# Altium PCB My_esp.PcbDoc
Units mm, origin at the board's own origin, x right, y up, seen from the top; angles counter-clockwise.
Board outline 31.6 x 52.7 mm, 4 copper layers (Top Layer, GND, PWR, Bottom Layer), stack 1.781 mm thick; 43 components, 53 nets, 213 pads, 86 vias.
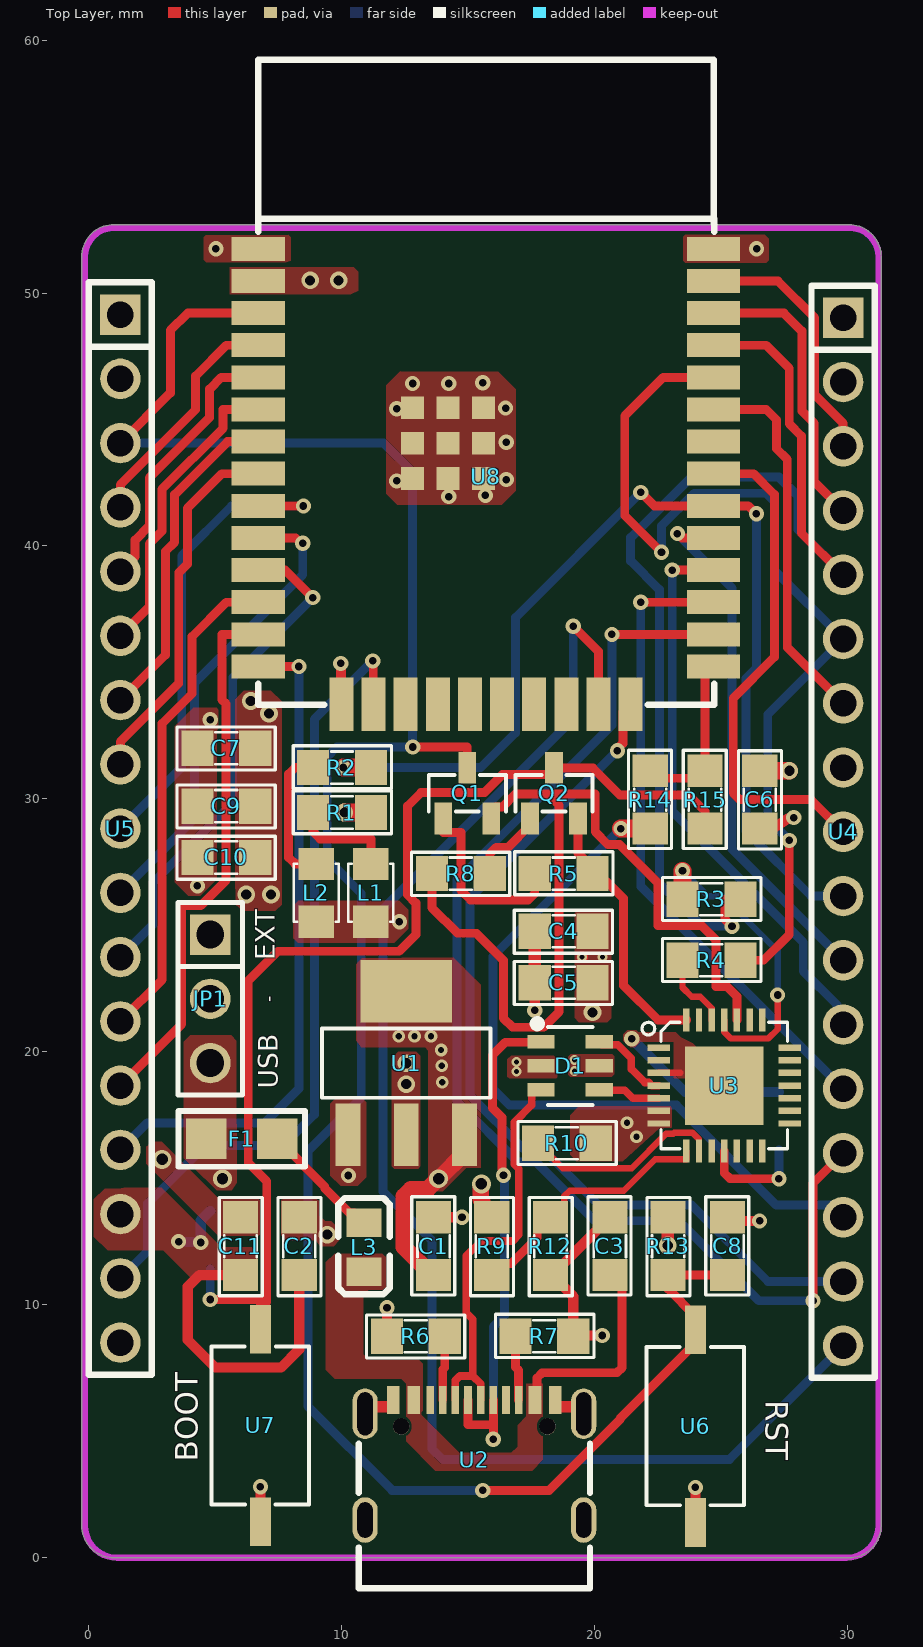
[diagram p0: Top Layer view]
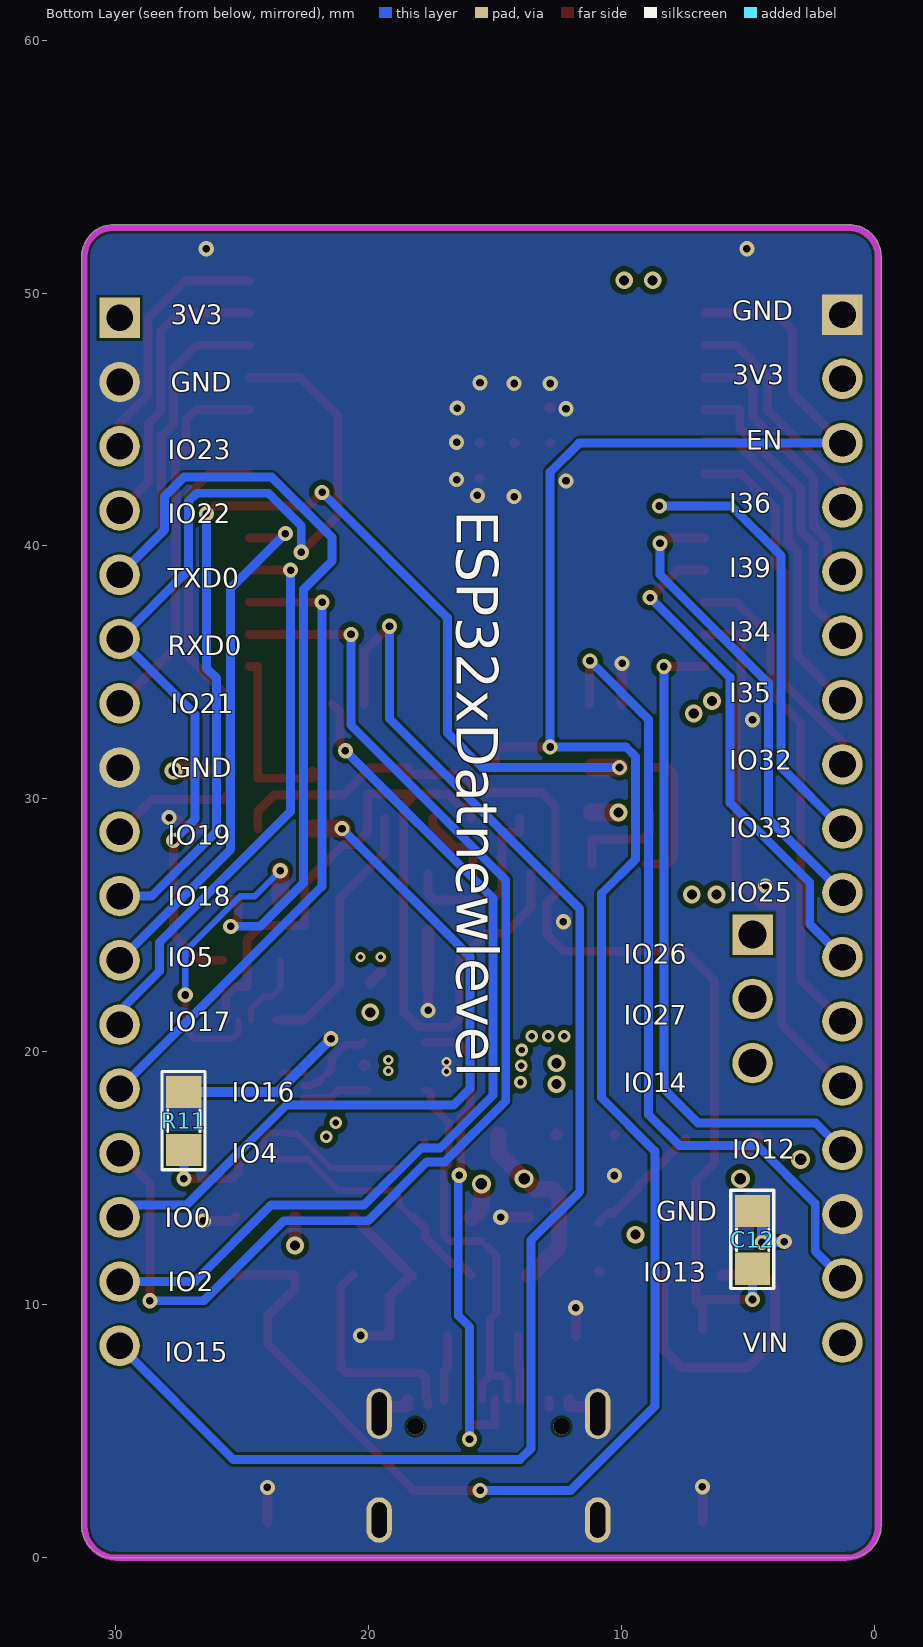
[diagram p1: Bottom Layer view, seen from below]
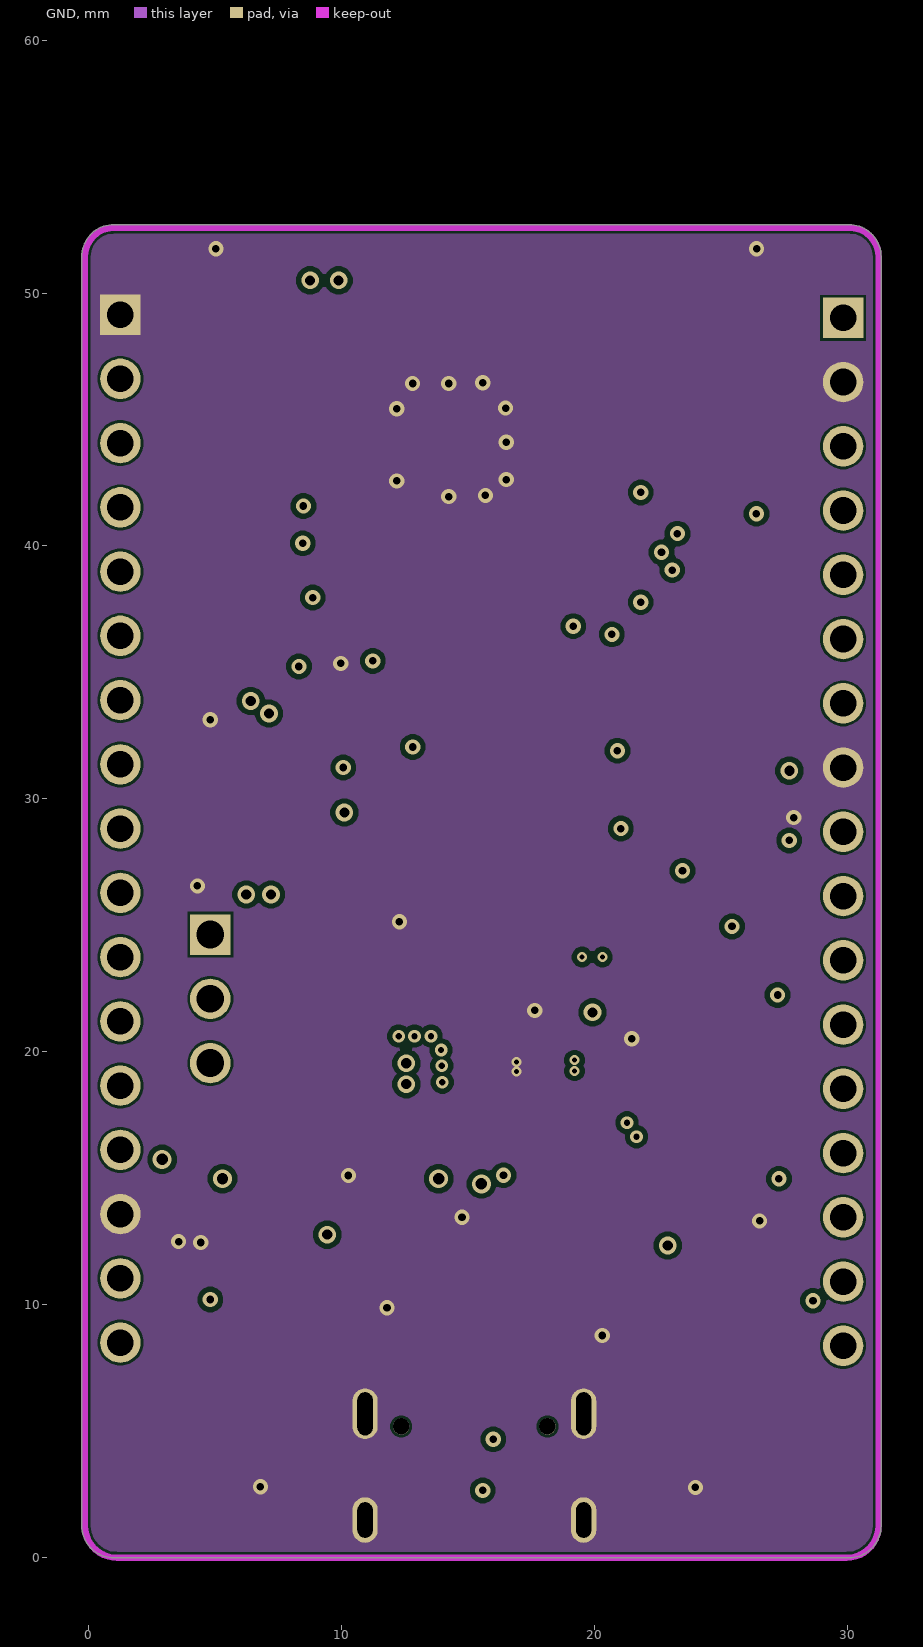
[diagram p2: GND]
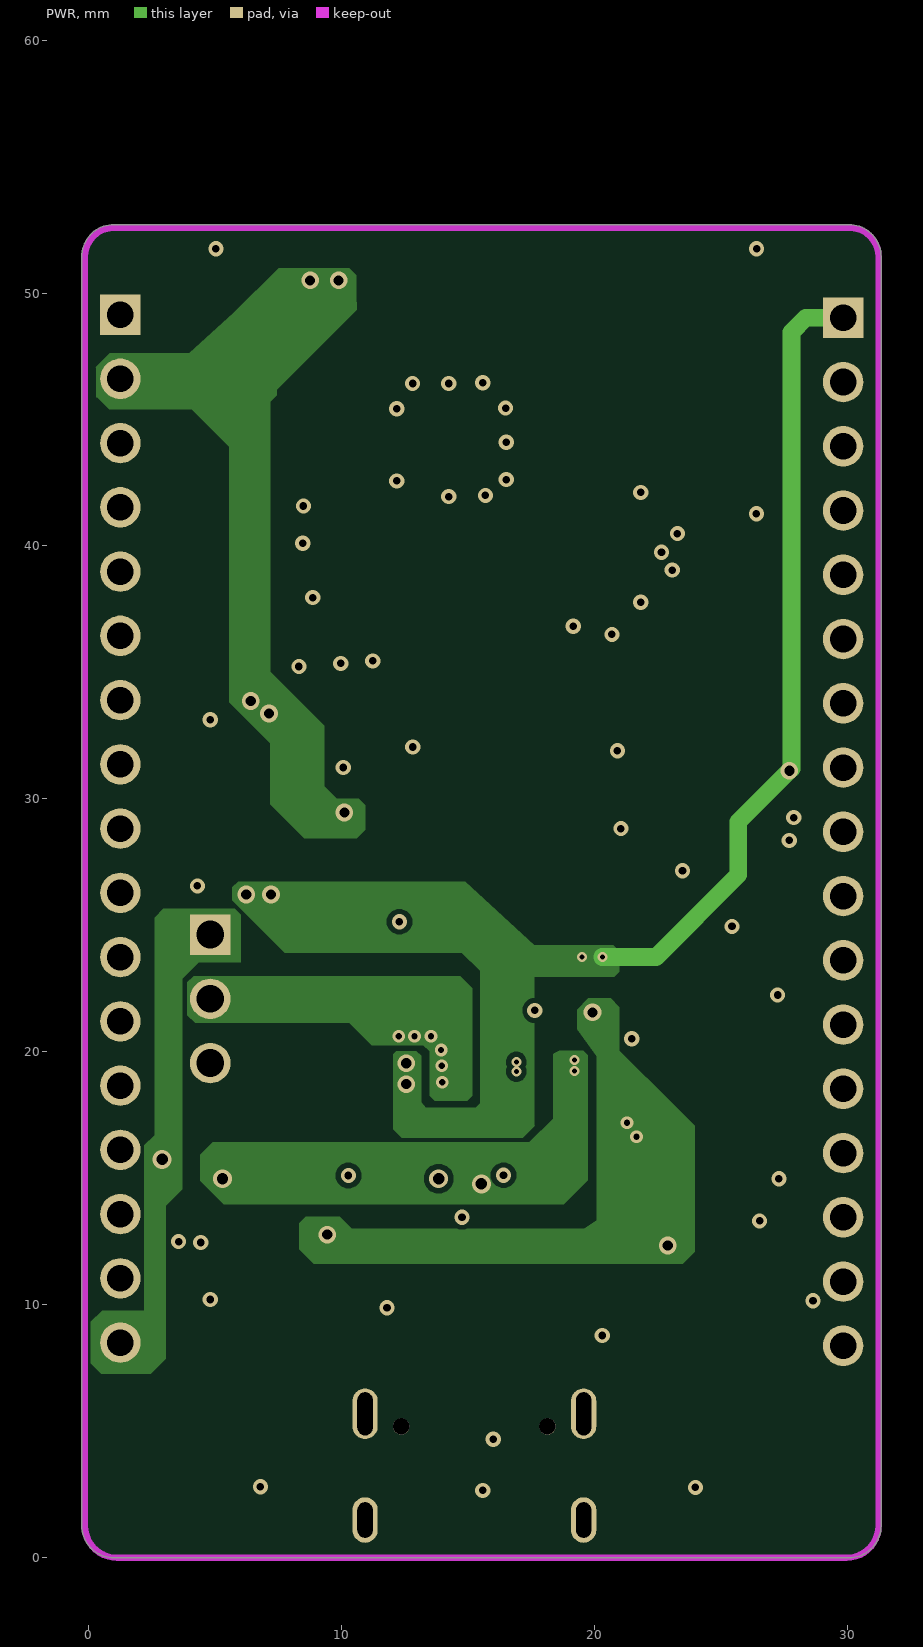
[diagram p3: PWR]
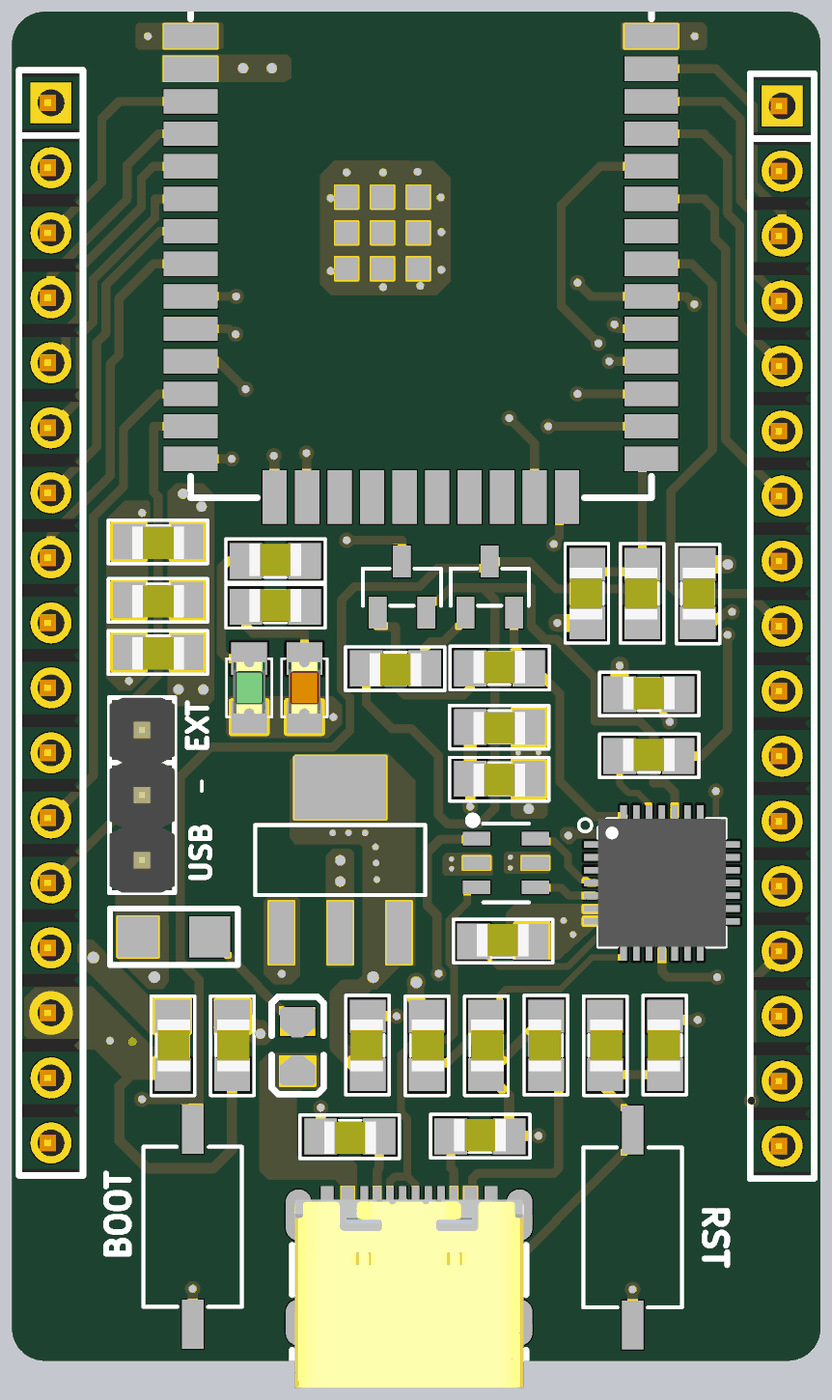
[diagram p4: 3D render of the assembled board from above, using the file's embedded part models]

## Layer stack, top to bottom
Top Solder: solder mask 0.0254, SM-001, Dk 4
Top Layer: signal copper 0.035
Dielectric 2: prepreg 0.0711, PP-006, Dk 4.1
GND: signal copper 0.035
Dielectric 1: core 1.4986, Core-043, Dk 4.3
PWR: signal copper 0.035
Dielectric 3: prepreg 0.0711, PP-006, Dk 4.1
Bottom Layer: signal copper 0.035
Bottom Solder: solder mask 0.0254, SM-001, Dk 4

## Board outline
-0.254,1.27 ccw(c1.016,1.27) 1.016,0 30.072,0 ccw(c30.072,1.27) 31.342,1.27 31.342,51.435 ccw(c30.072,51.435) 30.072,52.705 1.016,52.705 ccw(c1.016,51.435) -0.254,51.435

## Design rules (kind name [scope] priority, off if disabled: settings)
Clearance Clearance_Poly_Via [InPolygon vs IsVia] p1: gap=0.2 ignorepadtopadclearanceinfootprint=FALSE
Clearance [All] p2: gap=0.1 ignorepadtopadclearanceinfootprint=FALSE
DiffPairsRouting [InDifferentialPair('D')] p1: maxlimit=0.254 minlimit=0.254 mostfreqgap=0.254 toplayer_minwidth=0.381 toplayer_maxwidth=0.381 toplayer_prefwidth=0.381 midlayer1_minwidth=0.381 midlayer1_maxwidth=0.381 midlayer1_prefwidth=0.381 midlayer2_minwidth=0.381 midlayer2_maxwidth=0.381 midlayer2_prefwidth=0.381 bottomlayer_minwidth=0.381 bottomlayer_maxwidth=0.381 bottomlayer_prefwidth=0.381 maxuncoupledlength=12.7
HoleSize [All] p1: absolutevalues=TRUE maxlimit=2.54 minlimit=0.152 maxpercent=80.000 minpercent=20.000
MinimumSolderMaskSliver [All] p1: minsoldermaskwidth=0
PlaneClearance [All] p1: clearance=0.152
PolygonConnect [All] p1: connectstyle=Direct reliefconductorwidth=0.254 reliefentries=4 polygonreliefangle="90 Angle" airgapwidth=0.254
RoutingLayers RoutingLayers_52 [InNet('USB_D-')] p1: top layer_v5=TRUE mid layer 1_v5=FALSE mid layer 2_v5=FALSE bottom layer_v5=TRUE
RoutingLayers RoutingLayers_51 [InNet('USB_D+')] p2: top layer_v5=TRUE mid layer 1_v5=FALSE mid layer 2_v5=FALSE bottom layer_v5=TRUE
RoutingLayers RoutingLayers_50 [InNet('TXD0')] p3: top layer_v5=TRUE mid layer 1_v5=FALSE mid layer 2_v5=FALSE bottom layer_v5=TRUE
RoutingLayers RoutingLayers_49 [InNet('TXD')] p4: top layer_v5=TRUE mid layer 1_v5=FALSE mid layer 2_v5=FALSE bottom layer_v5=TRUE
RoutingLayers RoutingLayers_48 [InNet('RXD0')] p5: top layer_v5=TRUE mid layer 1_v5=FALSE mid layer 2_v5=FALSE bottom layer_v5=TRUE
RoutingLayers RoutingLayers_47 [InNet('RXD')] p6: top layer_v5=TRUE mid layer 1_v5=FALSE mid layer 2_v5=FALSE bottom layer_v5=TRUE
RoutingLayers RoutingLayers_46 [InNet('RTS')] p7: top layer_v5=TRUE mid layer 1_v5=FALSE mid layer 2_v5=FALSE bottom layer_v5=TRUE
RoutingLayers RoutingLayers_45 [InNet('NetR14_1')] p8: top layer_v5=TRUE mid layer 1_v5=FALSE mid layer 2_v5=FALSE bottom layer_v5=TRUE
RoutingLayers RoutingLayers_44 [InNet('NetR11_2')] p9: top layer_v5=TRUE mid layer 1_v5=FALSE mid layer 2_v5=FALSE bottom layer_v5=TRUE
RoutingLayers RoutingLayers_43 [InNet('NetR10_2')] p10: top layer_v5=TRUE mid layer 1_v5=FALSE mid layer 2_v5=FALSE bottom layer_v5=TRUE
RoutingLayers RoutingLayers_42 [InNet('NetR9_1')] p11: top layer_v5=TRUE mid layer 1_v5=FALSE mid layer 2_v5=FALSE bottom layer_v5=TRUE
RoutingLayers RoutingLayers_41 [InNet('NetQ2_1')] p12: top layer_v5=TRUE mid layer 1_v5=FALSE mid layer 2_v5=FALSE bottom layer_v5=TRUE
RoutingLayers RoutingLayers_40 [InNet('NetQ1_1')] p13: top layer_v5=TRUE mid layer 1_v5=FALSE mid layer 2_v5=FALSE bottom layer_v5=TRUE
RoutingLayers RoutingLayers_39 [InNet('NetL2_1')] p14: top layer_v5=TRUE mid layer 1_v5=FALSE mid layer 2_v5=FALSE bottom layer_v5=TRUE
RoutingLayers RoutingLayers_38 [InNet('NetL1_1')] p15: top layer_v5=TRUE mid layer 1_v5=FALSE mid layer 2_v5=FALSE bottom layer_v5=TRUE
RoutingLayers RoutingLayers_37 [InNet('NetF?_1')] p16: top layer_v5=TRUE mid layer 1_v5=FALSE mid layer 2_v5=FALSE bottom layer_v5=TRUE
RoutingLayers RoutingLayers_36 [InNet('NetC?_2')] p17: top layer_v5=TRUE mid layer 1_v5=FALSE mid layer 2_v5=FALSE bottom layer_v5=TRUE
RoutingLayers RoutingLayers_35 [InNet('IO_0_CON')] p18: top layer_v5=TRUE mid layer 1_v5=FALSE mid layer 2_v5=FALSE bottom layer_v5=TRUE
RoutingLayers RoutingLayers_34 [InNet('IO_0_BTN')] p19: top layer_v5=TRUE mid layer 1_v5=FALSE mid layer 2_v5=FALSE bottom layer_v5=TRUE
RoutingLayers RoutingLayers_33 [InNet('IO33')] p20: top layer_v5=TRUE mid layer 1_v5=FALSE mid layer 2_v5=FALSE bottom layer_v5=TRUE
RoutingLayers RoutingLayers_32 [InNet('IO32')] p21: top layer_v5=TRUE mid layer 1_v5=FALSE mid layer 2_v5=FALSE bottom layer_v5=TRUE
RoutingLayers RoutingLayers_31 [InNet('IO27')] p22: top layer_v5=TRUE mid layer 1_v5=FALSE mid layer 2_v5=FALSE bottom layer_v5=TRUE
RoutingLayers RoutingLayers_30 [InNet('IO26')] p23: top layer_v5=TRUE mid layer 1_v5=FALSE mid layer 2_v5=FALSE bottom layer_v5=TRUE
RoutingLayers RoutingLayers_29 [InNet('IO25')] p24: top layer_v5=TRUE mid layer 1_v5=FALSE mid layer 2_v5=FALSE bottom layer_v5=TRUE
RoutingLayers RoutingLayers_28 [InNet('IO23')] p25: top layer_v5=TRUE mid layer 1_v5=FALSE mid layer 2_v5=FALSE bottom layer_v5=TRUE
RoutingLayers RoutingLayers_27 [InNet('IO22')] p26: top layer_v5=TRUE mid layer 1_v5=FALSE mid layer 2_v5=FALSE bottom layer_v5=TRUE
RoutingLayers RoutingLayers_26 [InNet('IO21')] p27: top layer_v5=TRUE mid layer 1_v5=FALSE mid layer 2_v5=FALSE bottom layer_v5=TRUE
RoutingLayers RoutingLayers_25 [InNet('IO19')] p28: top layer_v5=TRUE mid layer 1_v5=FALSE mid layer 2_v5=FALSE bottom layer_v5=TRUE
RoutingLayers RoutingLayers_24 [InNet('IO18')] p29: top layer_v5=TRUE mid layer 1_v5=FALSE mid layer 2_v5=FALSE bottom layer_v5=TRUE
RoutingLayers RoutingLayers_23 [InNet('IO17')] p30: top layer_v5=TRUE mid layer 1_v5=FALSE mid layer 2_v5=FALSE bottom layer_v5=TRUE
RoutingLayers RoutingLayers_22 [InNet('IO16')] p31: top layer_v5=TRUE mid layer 1_v5=FALSE mid layer 2_v5=FALSE bottom layer_v5=TRUE
RoutingLayers RoutingLayers_21 [InNet('IO15')] p32: top layer_v5=TRUE mid layer 1_v5=FALSE mid layer 2_v5=FALSE bottom layer_v5=TRUE
RoutingLayers RoutingLayers_20 [InNet('IO14')] p33: top layer_v5=TRUE mid layer 1_v5=FALSE mid layer 2_v5=FALSE bottom layer_v5=TRUE
RoutingLayers RoutingLayers_19 [InNet('IO13')] p34: top layer_v5=TRUE mid layer 1_v5=FALSE mid layer 2_v5=FALSE bottom layer_v5=TRUE
RoutingLayers RoutingLayers_9 [InNet('IO12')] p35: top layer_v5=TRUE mid layer 1_v5=FALSE mid layer 2_v5=FALSE bottom layer_v5=TRUE
RoutingLayers RoutingLayers_18 [InNet('IO5')] p36: top layer_v5=TRUE mid layer 1_v5=FALSE mid layer 2_v5=FALSE bottom layer_v5=TRUE
RoutingLayers RoutingLayers_17 [InNet('IO4')] p37: top layer_v5=TRUE mid layer 1_v5=FALSE mid layer 2_v5=FALSE bottom layer_v5=TRUE
RoutingLayers RoutingLayers_16 [InNet('IO2')] p38: top layer_v5=TRUE mid layer 1_v5=FALSE mid layer 2_v5=FALSE bottom layer_v5=TRUE
RoutingLayers RoutingLayers_15 [InNet('I39')] p39: top layer_v5=TRUE mid layer 1_v5=FALSE mid layer 2_v5=FALSE bottom layer_v5=TRUE
RoutingLayers RoutingLayers_14 [InNet('I36')] p40: top layer_v5=TRUE mid layer 1_v5=FALSE mid layer 2_v5=FALSE bottom layer_v5=TRUE
RoutingLayers RoutingLayers_13 [InNet('I35')] p41: top layer_v5=TRUE mid layer 1_v5=FALSE mid layer 2_v5=FALSE bottom layer_v5=TRUE
RoutingLayers RoutingLayers_12 [InNet('I34')] p42: top layer_v5=TRUE mid layer 1_v5=FALSE mid layer 2_v5=FALSE bottom layer_v5=TRUE
RoutingLayers RoutingLayers_11 [InNet('EN')] p43: top layer_v5=TRUE mid layer 1_v5=FALSE mid layer 2_v5=FALSE bottom layer_v5=TRUE
RoutingLayers RoutingLayers_10 [InNet('DTR')] p44: top layer_v5=TRUE mid layer 1_v5=TRUE mid layer 2_v5=TRUE bottom layer_v5=TRUE
RoutingLayers RoutingLayers_8 [InNet('D-')] p45: top layer_v5=TRUE mid layer 1_v5=FALSE mid layer 2_v5=FALSE bottom layer_v5=TRUE
RoutingLayers RoutingLayers_7 [InNet('D+')] p46: top layer_v5=TRUE mid layer 1_v5=FALSE mid layer 2_v5=FALSE bottom layer_v5=TRUE
RoutingLayers RoutingLayers_6 [InNet('CC2')] p47: top layer_v5=TRUE mid layer 1_v5=FALSE mid layer 2_v5=FALSE bottom layer_v5=TRUE
RoutingLayers RoutingLayers_5 [InNet('CC1')] p48: top layer_v5=TRUE mid layer 1_v5=FALSE mid layer 2_v5=FALSE bottom layer_v5=TRUE
RoutingLayers RoutingLayers_4 [InNet('GND')] p49: top layer_v5=TRUE mid layer 1_v5=TRUE mid layer 2_v5=FALSE bottom layer_v5=FALSE
RoutingLayers RoutingLayers_3 [InNet('5V_VBUS')] p50: top layer_v5=TRUE mid layer 1_v5=FALSE mid layer 2_v5=TRUE bottom layer_v5=FALSE
RoutingLayers RoutingLayers_2 [InNet('5V_EXT')] p51: top layer_v5=TRUE mid layer 1_v5=FALSE mid layer 2_v5=TRUE bottom layer_v5=FALSE
RoutingLayers RoutingLayers_1 [InNet('5V')] p52: top layer_v5=TRUE mid layer 1_v5=FALSE mid layer 2_v5=TRUE bottom layer_v5=FALSE
RoutingLayers [InNet('3.3V')] p53: top layer_v5=TRUE mid layer 1_v5=FALSE mid layer 2_v5=TRUE bottom layer_v5=FALSE
RoutingVias "Schematic Routing Via Style" [InNet('3.3V')] p1: holewidth=0.305 width=0.508 viastyle="Through Hole" minholewidth=0.305 minwidth=0.508 maxholewidth=0.305 maxwidth=0.508
RoutingVias [All] p2: holewidth=0.25 width=0.5 viastyle="Through Hole" minholewidth=0.2 minwidth=0.4 maxholewidth=0.4 maxwidth=0.8
SilkToSolderMaskClearance [IsPad] p1: minsilkscreentomaskgap=0 clearancetoexposedcopper=TRUE
SolderMaskExpansion Tented_Vias [IsVia] p1: expansion=0.102 istentingtop=TRUE useseparateexpansions=TRUE expansionbottom=0.102 istentingbottom=TRUE
SolderMaskExpansion [All] p2: expansion=0.102 istentingtop=FALSE
UnRoutedNet [All] p1: checkbadconnections=TRUE
Width "Schematic Width Constraint" [InNet('3.3V')] p1: maxlimit=0.508 minlimit=0.508 preferedwidth=0.508
Width [All] p2: maxlimit=0.7 minlimit=0.254 preferedwidth=0.45
23 further rules are at their usual default settings.

## Classes and differential pairs
differential pair D: +D_P -D_N

## Components (designator, comment, footprint, x,y, rotation, side; value= is the part's Value field where it differs from the comment)
C1 "10uF" SM-0805 13.652,12.319 r270 top value=103
C2 "10uF" SM-0805 8.344,12.319 r90 top value=103
C3 "100nF" SM-0805 20.625,12.319 r270 top value=103
C4 "4.7uF" SM-0805 18.796,24.765 r0 top value=103
C5 "100nF" SM-0805 18.796,22.733 r0 top value=103
C6 "100nF" SM-0805 26.543,29.972 r90 top value=103
C7 "100nF" SM-0805 5.461,32.004 r0 top value=103
C8 "100nF" SM-0805 25.273,12.319 r270 top value=103
C9 "22uF" SM-0805 5.461,29.718 r0 top value=103
C10 "100nF" SM-0805 5.461,27.686 r0 top value=103
C11 "100nF" SM-0805 6.02,12.319 r90 top value=103
C12 "100nF" SM-0805 4.826,12.573 r270 bottom value=103
D1 "USBLC6-2SC6" SOT-23-6_L2.9-W1.6-P0.95-LS2.8-BL 19.054,19.446 r270 top
F1 "1.5A 6V" R1206 6.071,16.561 r180 top
JP1 "JP 1x3 2.54" "JP 1x3 DT" 4.826,24.638 r270 top
L1 "LED 0805" LED-0805-Red 11.176,27.432 r270 top
L2 "LED 0805" LED-0805-Green 9.017,27.432 r270 top
L3 "FB" L0805 10.909,12.319 r270 top
Q1 "SS8050-G" SOT-23-3_L2.9-W1.3-P1.90-LS2.4-BR 14.986,30.226 r270 top
Q2 "SS8050-G" SOT-23-3_L2.9-W1.3-P1.90-LS2.4-BR 18.415,30.226 r270 top
R1 "5.1K" SM-0805 10.033,29.464 r180 top value=1K
R2 "560R" SM-0805 10.033,31.242 r180 top value=1K
R3 "0R" SM-0805 24.638,26.035 r180 top value=1K
R4 "0R" SM-0805 24.638,23.622 r180 top value=1K
R5 "10K" SM-0805 18.796,27.051 r180 top value=1K
R6 "5.1K" SM-0805 12.954,8.763 r0 top value=1K
R7 "5.1K" SM-0805 18.034,8.763 r180 top value=1K
R8 "10K" SM-0805 14.732,27.051 r0 top value=1K
R9 "22.1K" SM-0805 15.951,12.319 r90 top value=1K
R10 "1K" SM-0805 18.923,16.383 r180 top
R11 "10K" SM-0805 27.305,17.272 r270 bottom value=1K
R12 "47.5K" SM-0805 18.275,12.319 r90 top value=1K
R13 "10K" SM-0805 22.924,12.319 r90 top value=1K
R14 "22R" SM-0805 22.225,29.972 r270 top value=1K
R15 "22R" SM-0805 24.384,29.972 r270 top value=1K
U1 "AMS1117-3.3_C347222" SOT-223-4_L6.5-W3.5-P2.30-LS7.0-BR 12.573,19.558 r270 top
U2 "HX TYPE-C 16PIN" TYPE-C-SMD_HX-TYPE-C-16PIN 15.265,2.743 r0 top
U3 "CP2102-GMR-QFN28" QFN28G_0.5-5X5MM 25.146,18.669 r0 top
U4 "Jump 1x17 2.54" HDR-TH_17P-P2.54-V-M 29.845,28.702 r270 top
U5 "Jump 1x17 2.54" HDR-TH_17P-P2.54-V-M 1.27,28.829 r270 top
U6 "Sw 2 chan 3X6X2.5MM" SW-SMD_L6.1-W3.7-LS8.0 24.003,5.207 r90 top
U7 "Sw 2 chan 3X6X2.5MM" SW-SMD_L6.1-W3.7-LS8.0 6.807,5.232 r90 top
U8 "ESP32-WROOM-32E(4MB)" WIFI-SMD_ESP32-WROOM-32E 15.659,46.02 r270 top

## Footprints (in the part's own frame and the unit in brackets; to place one, negate y for a bottom-side part, rotate by r counter-clockwise, add the part's x,y. Pads: shape width x height; smd on the part's side, far side on the other; paste and mask are expansions set on the pad)
HDR-TH_17P-P2.54-V-M [mm]
  rect 1.6x1.6 hole 1.05 paste-2539.97 mask+0.051: 1(-20.32,0)
  round 1.6 hole 1.05 paste-2539.97 mask+0.051: 2(-17.78,0) 3(-15.24,0) 4(-12.7,0) 5(-10.16,0) 6(-7.62,0) 7(-5.08,0) 8(-2.54,0) 9(0,0) 10(2.54,0) 11(5.08,0) 12(7.62,0) 13(10.16,0) 14(12.7,0) 15(15.24,0) 16(17.78,0) 17(20.32,0)
  silkscreen extent -21.59,-1.25 21.59,1.25, body extent -21.59,-1.4 21.59,1.14, height 3.05
"JP 1x3 DT" [mm]
  rect 1.6x1.6 hole 1.1: 1(0,0)
  round 1.6 hole 1.1: 2(2.54,0) 3(5.08,0)
  silkscreen extent -1.27,-1.27 6.35,1.27, body extent -1.27,-1.27 6.35,1.27, height 8.54
L0805 [mm]
  rect 1.133x1.377 smd paste-100 mask+0.051: 1(-0.926,0) 2(1.006,0)
  silkscreen extent -1.91,-1.02 1.91,1.02, body extent -1,-0.63 1,0.63, height 0.85
LED-0805-Green [mil]
  rect 50x55 smd: 1(0,0) 2(90,0)
  silkscreen extent 0,-35 90,35, body extent 5,-25 85,25, height 43
LED-0805-Red [mil]
  rect 50x55 smd: 1(0,0) 2(90,0)
  silkscreen extent 0,-35 90,35, body extent 5,-25 85,25, height 43
QFN28G_0.5-5X5MM [mm]
  rect 0.9x0.254 smd: 1(-2.59,1.5) 2(-2.59,1) 3(-2.59,0.5) 4(-2.59,0) 5(-2.59,-0.5) 6(-2.59,-1) 7(-2.59,-1.5) 15(2.59,-1.5) 16(2.59,-1) 17(2.59,-0.5) 18(2.59,0) 19(2.59,0.5) 20(2.59,1) 21(2.59,1.5)
  rect 0.254x0.9 smd: 8(-1.5,-2.59) 9(-1,-2.59) 10(-0.5,-2.59) 11(0,-2.59) 12(0.5,-2.59) 13(1,-2.59) 14(1.5,-2.59) 22(1.5,2.59) 23(1,2.59) 24(0.5,2.59) 25(0,2.59) 26(-0.5,2.59) 27(-1,2.59) 28(-1.5,2.59)
  rect 3.1x3.1 smd paste-3: 29(0,0)
  silkscreen extent -3.25,-2.5 2.5,2.5, body extent -2.5,-2.5 2.5,2.5, height 1
R1206 [mil]
  rect 63x63 smd paste+0 mask+2: 1(-55.12,0) 2(55.08,0)
  silkscreen extent -98,-43 98,43, body extent -62,-31 64,31, height 24
SM-0805 [mil] "Compoment SMD 80x50mil"
  rect 50x55 smd: 1(-45,0) 2(45,0)
  silkscreen extent -77,-34 76,33, body extent -40,-27 40,23, height 24
SOT-23-3_L2.9-W1.3-P1.90-LS2.4-BR [mm]
  rect 1.25x0.7 smd paste+0 mask+0.051: 1(1,-0.95) 2(1,0.95) 3(-1,0)
  silkscreen extent -0.73,-1.53 0.73,1.53, body extent -1.18,-1.4 1.18,1.52, height 1.05
SOT-23-6_L2.9-W1.6-P0.95-LS2.8-BL [mm]
  rect 0.532x1.072 smd paste+0 mask+0.051: 1(-0.95,-1.149) 2(0,-1.149) 3(0.95,-1.149) 4(0.95,1.149) 5(0,1.149) 6(-0.95,1.149)
  silkscreen extent -1.82,-1.45 1.54,0.89, body extent -1.38,-1.18 1.41,1.24, height 1.09
SOT-223-4_L6.5-W3.5-P2.30-LS7.0-BR [mm]
  rect 2.47x0.98 smd paste+0 mask+0.051: 1(2.835,-2.3) 2(2.835,0) 3(2.835,2.3)
  rect 2.47x3.6 smd paste+0 mask+0.051: 4(-2.835,0)
  silkscreen extent -1.37,-3.33 1.37,3.33, body extent -3.58,-3.2 3.42,3.3, height 0.89
SW-SMD_L6.1-W3.7-LS8.0 [mm]
  rect 1.92x0.84 smd paste+0 mask+0.051: 1(3.81,0) 2(-3.81,0)
  silkscreen extent -3.13,-1.93 3.13,1.93, body extent -4,-1.78 4,1.78, height 2.43
TYPE-C-SMD_HX-TYPE-C-16PIN [mm]
  oval 1x2 hole 0.6 slot 1.7 at 90 deg paste-2539.97 mask+0.051: 17(-4.32,2.951) 20(4.32,2.951)
  oval 1x1.8 hole 0.6 slot 1.4 at 90 deg paste-2539.97 mask+0.051: 18(-4.32,-1.249) 19(4.32,-1.249)
  rect 0.3x1.1 smd paste-100 mask+0.051: A5(-1.25,3.501) A6(-0.25,3.501) A7(0.25,3.501) A8(1.25,3.502) B5(1.75,3.501) B6(0.75,3.501) B7(-0.75,3.501) B8(-1.75,3.502)
  rect 0.5x1.1 smd paste-100 mask+0.051: A9B4(2.4,3.501) A12B1(3.2,3.501) B9A4(-2.4,3.501) B12A1(-3.2,3.501)
  round 0.65 hole 0.65 unplated paste-2539.97: ""(-2.89,2.451) ""(2.89,2.451)
  silkscreen extent -4.57,-3.95 4.57,1.76, body extent -4.47,-3.81 4.47,3.79, height 1.58
WIFI-SMD_ESP32-WROOM-32E [mm]
  rect 0.95x2.1 smd paste+0 mask+0.051: 1(-5.727,-8.936) 2(-4.457,-8.936) 3(-3.187,-8.936) 4(-1.917,-8.936) 5(-0.647,-8.936) 6(0.623,-8.936) 7(1.893,-8.936) 8(3.163,-8.936) 9(4.433,-8.936) 10(5.703,-8.936) 11(6.973,-8.936) 12(8.243,-8.936) 13(9.513,-8.936) 14(10.783,-8.936) 25(10.783,9.065) 26(9.513,9.065) 27(8.243,9.065) 28(6.973,9.065) 29(5.703,9.065) 30(4.433,9.065) 31(3.163,9.065) 32(1.893,9.065) 33(0.623,9.065) 34(-0.647,9.065) 35(-1.917,9.065) 36(-3.187,9.065) 37(-4.457,9.065) 38(-5.727,9.065)
  rect 2.1x0.95 smd paste+0 mask+0.051: 15(12.278,-5.65) 16(12.278,-4.38) 17(12.278,-3.11) 18(12.278,-1.84) 19(12.278,-0.57) 20(12.278,0.7) 21(12.278,1.97) 22(12.278,3.24) 23(12.278,4.51) 24(12.278,5.78)
  rect 0.9x0.9 smd paste+0 mask+0.051: 39(0.554,-0.035) 39(0.554,-1.435) 39(0.554,-2.835) 39(1.954,-0.035) 39(1.954,-2.835) 39(1.954,-1.436) 39(3.354,-1.435) 39(3.354,-0.035) 39(3.354,-2.835)
  silkscreen extent -13.2,-8.94 12.3,9.08, body extent -13.13,-9.02 12.39,9.02, height 3.15

## Part data
C1 C2 C3 C4 C5 C6 C7 C8 C9 C10 C11 C12: library part Tu, "Cap SMD"
F1: library part "Cau tri tu phuc hoi", "1.5A 6V SMD"
JP1: library part "JP 1x3 2.54 Duc Thang", "Cắm", Chung_Loai=Cắm, Don_Vi=Con, Ma_Hang=MH000903, Ten_Linh_Kien="Jump Đơn Đực 2.54MM 1x40P Thẳng 11MM"
L1: library part "LED 0805 Do", "Dán", Chung_Loai=Dán, Don_Vi=Con, Ma_Hang=MH000897, Ten_Linh_Kien="LED 0805 Màu Đỏ (Red)"
L2: library part "LED 0805 Xanh La", "Dán", Chung_Loai=Dán, Don_Vi=Con, Ma_Hang=MH002326, Ten_Linh_Kien="LED 0805 Màu Xanh Lá (Green)"
L3: library part FerriteBead
R1 R2 R3 R4 R5 R6 R7 R8 R9 R10 R11 R12 R13 R14 R15: library part RM, "Resistor SMD"
U3: "USB Bridge, USB to UART USB 2.0 UART Interface 28-QFN (5x5)", Package="VFQFN-28 Silicon Labs", Availability=Warning, Check_prices=https://www.snapeda.com/parts/CP2102-GMR/Silicon%20Labs/view-part/105743/?ref=eda, MF="Silicon Labs", MP=CP2102-GMR, Price=None, Purchase-URL=https://pricing.snapeda.com/search/part/CP2102-GMR/?ref=eda, SnapEDA_Link=https://www.snapeda.com/parts/CP2102-GMR/Silicon%20Labs/view-part/105743/?ref=snap

## Via types
v1: diameter 0.6, hole 0.3, Top Layer to Bottom Layer, tented both sides, 55 vias
v2: diameter 0.7, hole 0.4, Top Layer to Bottom Layer, tented both sides, 13 vias
v3: diameter 0.5, hole 0.25, Top Layer to Bottom Layer, tented both sides, 8 vias
v4: diameter 0.4, hole 0.2, Top Layer to Bottom Layer, tented both sides, 6 vias
v5: diameter 0.75, hole 0.45, Top Layer to Bottom Layer, tented both sides, 4 vias

## Nets (pads, with @x,y where several pads share a name; then routed paths per layer and width w, separated by ;. In a path a pad name is that pad's centre, name@x,y a point inside that pad or via, vN(x,y) a via of type N, cw(c..) or ccw(c..) an arc to the next point about the centre after c; other vN are vias at no path point)
3.3V: C2.2 C4.2 C5.2 C6.2 C7.2 C9.2 C10.2 R1.1 R10.1 R13.2 U1.2 U3.6 U3.7 U4.1 U5.2 U8.2 | length 35.4
  Top Layer w0.4: R13.2@22.911,13.449 R13.2
  Top Layer w0.45: v4(19.525,23.75) v4@19.529,23.746 ; C5.2@19.529,23.143 C5.2
  Top Layer w0.5: C2.2 C2.2@8.407,13.462 ; v2@9.412,12.813 v2(9.45,12.775) ; U1.2@12.56,16.736 U1.2 ; v2@19.939,21.557 v2(19.939,21.565) ; v2(22.911,12.344) R13.2@22.911,13.449
  Top Layer w0.7: v2(10.126,29.464) R1.1 ; C6.2 v2(27.719,31.115)
  PWR w0.7: v4(20.325,23.75) 22.45,23.75 25.7,27 25.7,29.096 v2(27.719,31.115) 27.8,31.196 27.8,48.45 28.372,49.022 U4.1
  other v2: 12.575,18.725 12.575,19.55 6.25,26.225 7.225,26.225 7.15,33.375 6.425,33.875 8.775,50.5 9.9,50.5
  other v3: 21.675,16.65 21.3,17.2
5V: C1.2 JP1.2 U1.3 U1.4 | length 7.5
  Top Layer w0.65: C1.2 13.589,11.176 12.477,12.288 12.477,14.295 12.756,14.574 13.418,14.574 13.83,14.986 v5(13.857,14.986) 14.873,16.002 U1.3
  other v3: 14,18.8 13.975,19.45 13.95,20.075 12.275,20.625 12.9,20.625 13.55,20.625
5V_EXT: C11.2 JP1.1 U5.17
  other v5: 2.925,15.75
5V_VBUS: D1.5 F1.2 JP1.3 R9.2 | length 2.3
  Top Layer w0.45: D1.5@20.162,19.487 D1.5
  Top Layer w0.65: F1.2 F1.2@5.147,16.086 ; v5(5.309,14.986) v5@5.309,15.013 ; v5@15.514,14.752 15.526,14.741 15.526,14.737 15.524,14.735 15.524,14.153 15.578,14.099 15.578,13.772 15.907,13.442 R9.2@15.932,13.442
  other v4: 19.225,19.25 19.225,19.675
  other v5: 15.545,14.783
CC1: R6.2 U2.A5 | length 2.6
  Top Layer w0.35: U2.A5 14.015,7.442 14.097,7.524 R6.2
CC2: R7.2 U2.B5 | length 2.6
  Top Layer w0.35: R7.2 16.891,7.541 17.015,7.417 U2.B5
D_N: D1.3 U2.A7 U2.B7 | length 16.1
  Top Layer w0.305: U2.B7 14.515,7.01 14.694,7.188 15.203,7.188 ; U2.A7 15.513,6.247 15.513,6.878 15.203,7.188 ; D1.3@17.774,18.481 17.65,18.481 17.537,18.367 17.537,17.904 16.84,17.208 16.84,15.558 17.024,15.374 17.024,12.77 16.776,12.522 15.533,12.522 14.948,11.937 14.948,9.69 15.203,9.435 15.203,7.188
D_P: D1.1 U2.A6 U2.B6 | length 21.1
  Top Layer w0.35: U2.A6 15.015,5.258 16.015,5.258 ; v1(16.015,4.686) 16.015,5.258 ; U2.B6 16.015,5.258 ; v1(16.419,15.124) 16.371,15.172 16.371,15.348 16.36,15.36 16.36,17.405 15.977,17.788 15.977,19.863 16.495,20.381 D1.1@17.774,20.381
  Bottom Layer w0.35: v1(16.015,4.686) 16.015,9.135 16.459,9.579 16.459,15.084 v1(16.419,15.124)
DTR: Q2.2 R5.1 U3.28 | length 10.4
  Top Layer w0.35: Q2.2 19.365,27.864 20.027,27.202 21.158,26.071 21.158,22.631 22.53,21.26 U3.28
EN: C8.2 Q1.3 R13.1 U5.3 U6.1 U8.3 | length 90.2
  Top Layer w0.35: U5.3 3.251,46.05 3.251,48.521 3.937,49.207 U8.3 ; v1(12.827,32.055) 14.986,32.055 Q1.3 ; v1(15.596,2.667) 18.228,2.667 21.017,5.456 21.017,5.491 24.003,8.477 24.003,9.55 22.924,10.63 R13.1 C8.2
  Bottom Layer w0.35: U5.3 11.684,44.069 12.827,42.926 v1(12.827,32.055) 9.83,32.055 9.449,31.674 9.449,27.61 10.795,26.264 10.795,18.186 8.687,16.078 8.687,5.994 12.014,2.667 v1(15.596,2.667)
GND: C1.1 C2.1 C3.1 C4.1 C5.1 C6.1 C7.1 C8.1 C9.1 C10.1 C11.1 C12.1 D1.2 L1.2 L2.2 R6.1 R7.1 R11.1 R12.1 U1.1 U2.17 U2.18 U2.19 U2.20 U2.A12B1 U2.B12A1 U3.3 U3.29 U4.2 U4.8 U5.1 U5.15 U6.2 U7.2 U8.1 U8.15 U8.38 U8.39 | length 45.6
  Top Layer w0.254: U2.17 U2.17@11.073,5.821 ; U2.20@19.458,5.821 U2.20 ; v1(21.488,20.523) v1@21.541,20.575 ; U3.3 23.394,19.169 23.4,19.175
  Top Layer w0.4: C11.1@5.956,11.176 4.394,11.176 3.937,10.719 3.937,8.611 5.029,7.518 7.62,7.518 8.344,8.242 C2.1 ; U7.2 v1(6.807,2.809) ; v1(9.982,35.357) 9.996,35.343 9.996,33.756 U8.15 ; U1.1 U1.1@10.28,16.716 ; v1@10.28,15.12 v1(10.287,15.113) ; R6.1 v1(11.811,9.889) ; C1.1 v1(14.778,13.462) ; v1(17.653,21.641) C5.1 ; R12.1 R12.1@18.339,11.176 ; v1(20.32,8.788) 19.202,8.788 R7.1 19.177,10.338 R12.1@18.339,11.176 ; C3.1 20.561,13.462 20.126,13.027 20.126,12.963 R12.1@18.339,11.176 ; U6.2 v1(24.003,2.784) ; C8.1 25.418,13.317 v1(26.543,13.317) ; C6.1 27.059,28.829 27.669,29.227 27.856,29.227 v1(27.889,29.261)
  Top Layer w0.45: C11.1@5.956,11.176 C11.1 ; U2.17 10.945,5.715 11.199,5.969 12.04,5.969 12.065,5.994 U2.B12A1 ; U2.A12B1 18.465,5.994 18.49,5.969 19.331,5.969 19.585,5.715 U2.20
  Top Layer w0.5: C5.1 C4.1
  Bottom Layer w0.4: v1(3.575,12.5) 3.592,12.482 4.433,12.482 v1(4.45,12.465) ; v1@4.45,12.45 4.45,13.34 C12.1 ; v1(21.488,20.523) 23.597,18.415 R11.1
  other v1: 12.302,25.146 4.318,26.56 4.826,33.13 14.25,41.95 15.7,42 12.2,42.575 16.525,42.625 16.525,44.1 12.2,45.425 16.5,45.45 12.825,46.425 14.25,46.425 15.6,46.45 5.05,51.75 26.425,51.75
  other v4: 16.925,19.225 16.925,19.6
I34: U5.6 U8.6 | length 12
  Top Layer w0.35: U5.6 2.413,37.592 2.413,40.082 2.915,40.584 2.915,42.24 5.334,44.658 5.334,45.397 U8.6
I35: U5.7 U8.7 | length 13.2
  Top Layer w0.35: U5.7 3.057,35.696 3.057,39.788 3.418,40.148 3.418,42.031 5.513,44.127 U8.7
I36: U5.4 U8.4 | length 9.4
  Top Layer w0.35: U5.4 1.27,42.418 4.242,45.39 4.242,46.718 5.461,47.937 U8.4
I39: U5.5 U8.5 | length 10.8
  Top Layer w0.35: U5.5 1.854,39.573 1.854,40.234 2.413,40.792 2.413,42.697 4.801,45.085 4.801,46.203 5.265,46.667 U8.5
IO2: U4.16 U8.24 | length 35.9
  Top Layer w0.35: v1(20.92,31.907) 20.92,31.975 21.139,32.194 21.139,33.442 U8.24
  Bottom Layer w0.35: v1(20.92,31.907) 15.088,26.075 15.088,18.287 17.175,16.2 17.925,16.2 20.175,13.95 23.845,13.95 26.873,10.922 U4.16
IO4: U4.14 U8.26 | length 48.7
  Top Layer w0.35: v1(20.701,36.507) U8.26 ; v1(28.651,10.16) 28.651,14.808 U4.14
  Bottom Layer w0.35: v1(20.701,36.507) 20.701,32.918 14.58,26.797 14.58,18.059 16.989,15.65 17.7,15.65 20.025,13.325 23.35,13.325 26.515,10.16 v1(28.651,10.16)
IO5: U4.11 U8.29 | length 21.1
  Top Layer w0.35: v1(23.292,40.488) 23.462,40.317 U8.29
  Bottom Layer w0.35: v1(23.292,40.488) 25.458,38.322 25.458,28.009 U4.11
IO12: U5.14 U8.14 | length 26.4
  Top Layer w0.35: U8.14 v1(8.331,35.237)
  Bottom Layer w0.35: U5.14 2.337,17.196 6.985,17.196 8.331,18.542 v1(8.331,35.237)
IO13: U5.16 U8.16 | length 32.1
  Top Layer w0.35: v1(11.252,35.458) 11.266,35.445 11.266,33.756 U8.16
  Bottom Layer w0.35: U5.16 2.345,12.124 2.345,14.004 4.648,16.307 7.722,16.307 8.941,17.526 8.941,33.147 v1(11.252,35.458)
IO14: U5.13 U8.13 | length 21.5
  Top Layer w0.35: U5.13 3.693,21.092 3.693,25.781 4.445,25.781 5.453,26.789 5.453,33.757 5.283,33.927 5.283,36.507 U8.13
IO15: U4.17 U8.23 | length 58.2
  Top Layer w0.35: v1(19.177,36.83) 20.169,35.838 U8.23
  Bottom Layer w0.35: v1(19.177,36.83) 19.177,33.172 11.659,25.654 11.659,14.478 13.589,12.548 13.589,4.318 14.021,3.886 25.349,3.886 U4.17
IO16: U4.13 U8.27 | length 25.4
  Top Layer w0.35: v1(21.844,37.777) U8.27
  Bottom Layer w0.35: v1(21.844,37.777) 21.844,26.543 U4.13
IO17: U4.12 U8.28 | length 22.4
  Top Layer w0.35: v1(23.089,39.047) U8.28
  Bottom Layer w0.35: v1(23.089,39.047) 23.089,29.509 28.27,24.327 28.27,23.19 29.606,21.855 29.606,21.321 U4.12
IO18: R2.1 U4.10 U8.30 | length 42.6
  Top Layer w0.35: v1(21.844,42.12) 22.377,41.587 26.095,41.587 26.408,41.275 v1(26.416,41.275)
  Top Layer w0.7: v1(10.084,31.242) R2.1
  Bottom Layer w0.35: v1(10.084,31.242) 15.519,31.242 16.891,32.614 16.891,37.167 v1(21.844,42.12) ; v1(26.416,41.275) 26.416,35.171 26.01,34.764 26.01,28.727 28.575,26.162 U4.10
IO19: U4.9 U8.31 | length 20.2
  Top Layer w0.35: U8.31 26.307,42.857 27.127,42.037 27.127,35.611 25.502,33.985 25.502,30.226 25.756,29.972 28.575,29.972 U4.9
IO21: U4.7 U8.33 | length 15
  Top Layer w0.35: U8.33 26.797,45.397 27.21,44.984 27.21,43.847 27.635,43.423 27.635,35.992 U4.7
IO22: U4.4 U8.36 | length 11.6
  Top Layer w0.35: U8.36 27.501,49.207 28.215,48.493 28.215,45.339 28.702,44.852 28.702,42.545 U4.4
IO23: U4.3 U8.37 | length 10.1
  Top Layer w0.35: U8.37 27.262,50.477 28.718,49.022 28.718,45.974 29.845,44.847 U4.3
IO25: U5.10 U8.10 | length 18.7
  Top Layer w0.35: U8.10 8.206,40.317 8.416,40.107 v1(8.484,40.107)
  Bottom Layer w0.35: U5.10 4.199,29.218 4.199,34.577 8.484,38.862 v1(8.484,40.107)
IO26: U5.11 U8.11 | length 20
  Top Layer w0.35: U8.11 7.791,39.047 v1(8.877,37.96)
  Bottom Layer w0.35: U5.11 2.565,25.044 2.565,26.695 5.715,29.845 5.715,34.798 v1(8.877,37.96)
IO27: U5.12 U8.12 | length 19.6
  Top Layer w0.35: U5.12 2.921,22.86 2.921,32.982 4.103,34.163 4.103,36.419 5.461,37.777 U8.12
IO32: U5.8 U8.8 | length 14.6
  Top Layer w0.35: U5.8 1.27,32.258 3.581,34.569 3.581,38.946 3.92,39.285 3.92,41.494 5.283,42.857 U8.8
IO33: U5.9 U8.9 | length 19.2
  Top Layer w0.35: U8.9 6.728,41.583 8.505,41.583 v1(8.509,41.58)
  Bottom Layer w0.35: U5.9 3.696,31.255 3.696,39.613 5.663,41.58 v1(8.509,41.58)
IO_0_BTN: C12.2 Q2.3 R15.2 U7.1 | length 44.3
  Top Layer w0.35: v1(4.826,10.211) 6.807,10.211 U7.1@6.807,9.855 ; U7.1 U7.1@6.807,9.855 ; Q2.3 Q2.3@18.415,31.217 ; R15.2 24.384,29.515 23.749,30.15 21.024,30.15 19.957,31.217 Q2.3@18.415,31.217 ; U7.1@6.807,9.855 7.061,10.109 7.061,14.884 6.325,15.621 6.325,22.809 7.493,23.978 12.294,23.978 12.954,24.638 12.954,25.883 12.624,26.213 12.624,29.718 13.157,30.251 15.663,30.251 16.375,30.963 18.415,30.963 Q2.3@18.415,31.217
  Bottom Layer w0.35: v1(4.826,10.211) C12.2
IO_0_CON: R14.2 U4.15 | length 29.5
  Top Layer w0.7: v1(21.057,28.829) R14.2
  Bottom Layer w0.35: v1(21.057,28.829) 16.002,23.774 16.002,18.542 16.644,17.9 23.25,17.9 27.205,13.945 29.362,13.945 U4.15
NetC3_2: C3.2 L3.2 U2.A9B4 U2.B9A4 | length 8.9
  Top Layer w0.35: L3.2@10.846,11.313 L3.2 ; U2.B9A4@12.865,5.944 U2.B9A4 ; U2.A9B4@17.665,6.045 U2.A9B4 17.74,6.319 17.74,7.11 17.945,7.315 20.902,7.315 21.107,7.52 21.107,10.716 20.647,11.176 C3.2
NetF1_1: F1.1 L3.1 | length 4.9
  Top Layer w0.35: F1.1 9.354,14.677 9.354,14.605 10.323,13.636 10.518,13.636 L3.1
NetL1_1: L1.1 R1.2 | length 4.2
  Top Layer w0.35: R1.2 8.89,28.702 9.169,28.423 11.176,28.423 L1.1
NetL2_1: L2.1 R2.2 | length 5.6
  Top Layer w0.35: R2.2 8.179,31.242 7.925,30.988 7.925,27.686 8.179,27.432 L2.1
NetQ1_1: Q1.1 R5.2 | length 7.5
  Top Layer w0.35: Q1.1 14.036,28.677 14.732,28.677 14.732,26.391 15.113,26.01 17.399,26.01 17.653,26.264 R5.2
NetQ2_1: Q2.1 R8.2 | length 3.1
  Top Layer w0.35: R8.2 15.875,27.838 16.129,28.092 16.601,28.092 17.465,28.956 Q2.1
NetR9_1: R9.1 R12.2 U3.8 | length 10.3
  Top Layer w0.254: R12.2 18.303,13.462 18.811,13.97 18.811,14.29 19.037,14.515 21.17,14.515 22.411,15.756 23.646,15.756 U3.8
  Top Layer w0.35: R9.1 16.411,11.636 16.732,11.636 17.752,12.656 17.752,13.002 18.212,13.462 R12.2
NetR10_2: R10.2 U3.9 | length 8
  Top Layer w0.254: R10.2 17.78,16.319 18.288,15.811 18.351,15.811 18.758,15.405 21.485,15.405 22.843,16.763 23.122,16.763 23.168,16.808 23.889,16.808 24.146,16.551 U3.9
  Top Layer w0.3: R10.2 R10.2@17.78,16.447
NetR11_2: R11.2 U3.11 | length 4.3
  Top Layer w0.35: U3.11 25.146,15.215 25.375,14.986 v1(27.305,14.986)
  Bottom Layer w0.35: v1(27.305,14.986) R11.2
NetR14_1: R14.1 R15.1 U8.25 | length 7.2
  Top Layer w0.35: R14.1 22.225,30.819 24.384,30.819 R15.1 24.384,35.237 U8.25
RTS: Q1.2 R8.1 U3.24 | length 36.2
  Top Layer w0.35: R8.1 13.589,25.705 14.605,24.689 15.348,24.689 16.414,23.622 16.414,21.336 16.776,20.974 18.003,20.974 18.618,21.59 18.618,29.743 18.161,30.201 ; Q1.2 15.936,29.501 16.111,29.676 16.366,29.676 16.891,30.201 18.161,30.201 ; U3.24 25.646,22.2 25.265,22.581 24.816,22.581 24.816,24.435 24.257,24.994 22.53,24.994 22.53,26.67 21.006,28.194 20.55,28.194 20.042,28.702 20.042,30.201 18.161,30.201
RXD: R3.2 U3.25 | length 12.1
  Top Layer w0.254: U3.25 25.146,20.787 25.403,20.53 26.889,20.53 27.254,20.895 v1(27.254,22.25)
  Top Layer w0.7: R3.2 v1(23.495,27.161)
  Bottom Layer w0.254: v1(23.495,27.161) 24.508,26.147 25.083,26.147 27.254,23.976 v1(27.254,22.25)
RXD0: R4.1 U4.6 U8.34 | length 38.5
  Top Layer w0.35: v1(22.664,39.751) 21.209,41.206 21.209,45.143 22.733,46.667 U8.34 ; R4.1 26.695,23.622 27.711,24.638 v1(27.711,28.361)
  Bottom Layer w0.35: v1(22.664,39.751) 22.664,40.792 23.96,42.088 26.797,42.088 27.127,41.758 27.127,39.04 U4.6 26.863,33.34 26.863,29.21 v1(27.711,28.361)
TXD: R4.2 U3.26 | length 3
  Top Layer w0.254: R4.2 23.495,22.543 23.854,22.184 24.194,22.184 24.646,21.731 U3.26
TXD0: R3.1 U4.5 U8.35 | length 43.7
  Top Layer w0.35: U8.35 26.797,47.937 27.713,47.021 27.713,44.831 28.194,44.35 28.194,40.513 U4.5 ; v1(25.451,24.96) 25.171,25.24 25.171,26.035 R3.1
  Bottom Layer w0.35: v1(25.451,24.96) 25.443,24.968 24.282,24.968 22.581,26.67 22.581,38.278 21.445,39.413 21.445,40.33 23.838,42.723 27.305,42.723 28.066,41.962 28.066,40.641 U4.5
USB_D+: D1.6 U3.4 | length 3.3
  Top Layer w0.3: D1.6 20.31,20.29 20.935,20.29 21.469,19.756 21.469,19.326 22.002,18.792 22.156,18.792 22.279,18.669 U3.4
USB_D-: D1.4 U3.5 | length 2.6
  Top Layer w0.3: D1.4@20.072,18.481 21.212,18.481 21.524,18.169 U3.5
pads on no net: U2. U2.A8 U2.B8 U3.1 U3.2 U3.10 U3.12 U3.13 U3.14 U3.15 U3.16 U3.17 U3.18 U3.19 U3.20 U3.21 U3.22 U3.23 U3.27 U8.17 U8.18 U8.19 U8.20 U8.21 U8.22 U8.32

## Polygon pours and split planes (outlines as drawn)
GND on Top Layer "GND_L01_P000" (solid, pour order 0): 16.729,19.85 16.575,19.718 16.575,19.025 16.65,18.95 18.5,18.95 18.55,19 18.55,19.7 18.4,19.85
5V_VBUS on Top Layer "5V_VBUS_L01_P026" (solid, pour order 26): 4.025,20.65 3.775,20.4 3.775,15.8 4.125,15.45 5.85,15.45 5.875,15.475 5.85,15.5 5.85,20.45 5.65,20.65
GND on Top Layer "GND_L01_P025" (solid, pour order 25): 23.425,20.575 23.225,20.775 21.75,20.775 21.675,20.85 21.3,20.85 21.15,20.7 21.15,20.45 21.425,20.175 21.625,20.175 21.848,20.398 23.121,20.398 23.15,20.37 23.15,18.95 23.875,18.95 24.075,19.15 24.075,20.166 23.9,20.341 23.9,20.343
NetC3_2 on Top Layer "NETC3_2_L01_P024" (solid, pour order 24): 11.1,7.825 10.875,8.05 10.875,10.375 11.1,10.6 11.65,10.6 11.775,10.725 11.775,11.9 11.75,11.9 11.625,12.025 9.75,12.025 9.4,11.675 9.4,7.425 9.75,7.075 12.375,7.075 12.575,6.875 12.575,5.737 13.145,5.737 13.225,5.818 13.225,7.675 13.075,7.825
NetC3_2 on Top Layer "NETC3_2_L01_P023" (solid, pour order 23): 16.975,4.4 16.725,4.15 14.675,4.15 13.175,5.65 13.175,6.85 13.1,6.925 13.096,6.921 12.621,6.921 12.575,6.875 12.575,4.6 13.725,3.45 17.55,3.45 17.975,3.875 17.975,6.875 17.325,6.875 17.325,5.6 16.975,5.25
3.3V on Top Layer "3.3V_L01_P021" (solid, pour order 21): 9.363,13.3 9.125,13.537 9.125,14.1 9.025,14.2 7.725,14.2 7.625,14.15 7.625,12.75 7.825,12.55 8.975,12.55 9.2,12.325 9.7,12.325 9.9,12.525 9.9,13 9.6,13.3
GND on Top Layer "GND_L01_P020" (solid, pour order 20): 23.604,52.3 23.525,52.221 23.525,51.275 23.6,51.2 26.8,51.2 26.9,51.3 26.9,52.15 26.75,52.3 23.625,52.3
GND on Top Layer "GND_L01_P019" (solid, pour order 19): 4.651,52.276 4.575,52.2 4.575,51.325 4.675,51.225 7.825,51.225 8,51.275 8,52.2 7.9,52.3
GND on Top Layer "GND_L01_P018" (solid, pour order 18): 4.15,33.6 3.425,32.875 3.425,26.7 3.95,26.175 4.425,26.175 5.075,26.825 5.075,32.7 5.15,32.775 5.15,33.525 5.075,33.6
3.3V on Top Layer "3.3V_L01_P017" (solid, pour order 17): 5.82,26.442 5.825,26.437 5.825,25.825 6.1,25.575 7.4,25.575 7.65,25.825 7.642,25.833 7.642,33.858 7.225,34.275 6.15,34.275 5.82,33.945
GND on Top Layer "GND_L01_P016" (solid, pour order 16): 8.3,25.975 8.1,25.775 8.1,24.5 8.275,24.325 12.1,24.325 12.65,24.875 12.65,25.625 12.3,25.975 11.7,25.975
5V_VBUS on Top Layer "5V_VBUS_L01_P015" (solid, pour order 15): 5.661,17.425 5.875,17.15 5.875,14.825 5.675,14.525 5.075,14.525 4.15,15.45 4.15,17.425
3.3V on Top Layer "3.3V_L01_P014" (solid, pour order 14): 5.6,51.025 5.6,49.95 10.375,49.95 10.675,50.1 10.675,50.85 10.5,51.025
GND on Top Layer "GND_L01_P013" (solid, pour order 13): 12.338,46.913 11.775,46.35 11.775,42.075 12.225,41.625 16.35,41.625 16.9,42.175 16.9,46.2 16.212,46.888
5V_EXT on Top Layer "5V_EXT_L01_P012" (solid, pour order 12): 5.8,14.225 6.7,14.225 6.8,14.125 6.8,12.8 6.725,12.725 5.15,12.725 2.3,15.575 2.3,16.25 2.387,16.337 2.6,16.45 2.9,16.45 5.075,14.275 5.725,14.225
GND on Top Layer "GND_L01_P011" (solid, pour order 11): 9.575,17.95 9.575,15.1 9.975,14.7 10.65,14.7 11,15.05 11,18 10.875,18.125 9.75,18.125 10.875,18.125 9.75,18.125
3.3V on Top Layer "3.3V_L01_P010" (solid, pour order 10): 12.25,20 12.002,19.752 12.002,15.473 12.1,15.375 13.075,15.375 13.15,15.45 13.125,15.475 13.125,19.85 12.975,20
5V on Top Layer "5V_L01_P009" (solid, pour order 9): 10.587,23.462 10.7,23.575 10.85,23.725 14.45,23.725 15.525,22.65 15.525,15.425 14.95,15.425 14.025,14.5 13.493,14.5 13.6,14.5 13.45,14.606 13.45,20.05 13.325,20.175 10.8,20.175 10.587,20.45
3.3V on Top Layer "3.3V_L01_P008" (solid, pour order 8): 19.3,15.675 19.05,15.925 19.05,17.5 19.4,17.85 23.025,17.85 23.075,17.75 23.075,17.025 23.025,16.975 22.584,16.975 21.134,15.675
GND on Top Layer "GND_L01_P007" (solid, pour order 7): 1.4,14.625 1.2,14.6 0.65,14.6 0.225,14.175 0.225,12.7 0.775,12.15 2.963,12.15 4.166,10.947 4.193,10.975 6.7,10.975 6.7,12.05 6.475,12.275 5.25,12.275 2.9,14.625 1.475,14.625
3.3V on Top Layer "3.3V_L01_P006" (solid, pour order 6): 19.375,25.625 19.225,25.475 19.225,21.35 19.4,21.175 20.525,21.175 20.675,21.325 20.675,25.425 20.675,25.55 20.55,25.625
5V_VBUS on Top Layer "5V_VBUS_L01_P005" (solid, pour order 5): 20.725,19.9 20.8,19.825 20.8,19.125 20.7,19.025 19.05,19.025 18.975,19.1 18.975,19.8 19.075,19.9
3.3V on PWR "3.3V_L03_P041" (solid, pour order 41): 20.1,17.3 20.1,14.425 20.1,13.345 19.612,13 19.075,13 10.425,13 9.95,13.475 8.6,13.475 8.35,13.225 8.35,12.2 8.925,11.625 23.5,11.625 23.975,12.1 23.975,17.075 23.1,17.95
3.3V on PWR "3.3V_L03_P040" (solid, pour order 40): 19.775,22.125 19.325,21.675 19.325,20.9 20.1,19.825 20.1,16.425 20.675,16.1 22.825,16.1 23.1,16.375 23.1,17.95 21,20.05 21,21.775 20.65,22.125
5V_VBUS on PWR "5V_VBUS_L03_P032" (solid, pour order 32): 18.8,13.975 19.75,14.925 19.75,19.865 19.565,20.05 18.625,20.05 18.425,19.95 18.375,19.9 18.375,17.359 17.441,16.425 4.925,16.425 4.425,15.925 4.425,14.9 5.35,13.975
3.3V on PWR "3.3V_L03_P038" (solid, pour order 38): 17.625,24.225 20.75,24.225 21,23.975 21,23.175 20.8,22.975 17.625,22.975
3.3V on PWR "3.3V_L03_P037" (solid, pour order 37): 7.843,34.382 9.325,32.9 9.325,30.5 9.825,30 10.7,30 10.95,29.75 10.95,28.775 10.625,28.45 8.55,28.45 7.2,29.8 7.2,32.2 6.518,32.882
3.3V on PWR "3.3V_L03_P036" (solid, pour order 36): 7.2,45.7 7.45,45.95 7.45,46.475 4,46.475 3.65,46.125 3.65,45.85 5.575,43.925 5.575,33.825 6.7,32.7 7.625,32.7 8.025,33.1 8.025,34.2 7.2,35.025
3.3V on PWR "3.3V_L03_P034" (solid, pour order 34): 13.352,17.798 13.159,18 13.159,19.841 12.975,20.025 12.175,20.025 12.05,19.9 12.05,16.95 12.4,16.6 17.175,16.6 17.65,17.075 17.625,17.1 17.625,24.225 14.9,26.725 5.925,26.725 5.7,26.5 5.7,26 7.775,23.925 14.775,23.925 15.5,23.2 15.5,17.975 15.323,17.798
3.3V on PWR "3.3V_L03_P033" (solid, pour order 33): 5.762,49.212 5.7,49.15 7.525,50.975 10.325,50.975 10.6,50.7 10.6,49.975 10.612,49.337 6.675,45.4 0.825,45.4 0.35,45.875 0.325,45.875 0.325,47.05 0.3,47.075 0.85,47.625 4,47.625
5V on PWR "5V_L03_P031" (solid, pour order 31): 4.175,23 3.925,22.75 3.925,21.45 4.225,21.15 5.4,21.15 5.45,21.15 5.5,21.15 10.325,21.15 11.203,20.272 13.253,20.272 13.5,20.025 13.5,18.275 13.7,18.075 14.975,18.075 15.175,18.275 15.175,22.525 14.7,23
5V_EXT on PWR "5V_EXT_L03_P030" (solid, pour order 30): 5.8,25.65 6.025,25.425 6.025,23.55 4.375,23.55 3.725,22.9 3.725,14.575 3.075,13.925 3.075,7.875 2.475,7.275 0.525,7.275 0.075,7.725 0.075,9.3 0.55,9.775 2.225,9.775 2.225,16.3 2.625,16.7 2.625,25.3 2.975,25.65
GND on Bottom Layer "GND_L04_P043" (solid, remove dead copper, pour order 43): 8.675,64.675 -0.25,64.675 -12.65,52.275 -12.65,-10.125 32.8,-10.125 35.4,-12.725 51.75,3.625 51.75,56.125 48.775,59.1
GND on GND "GND_L02_P039" (solid, remove dead copper, pour order 39): 3.125,55.825 1.125,53.825 -4.925,53.825 -4.925,-1.675 -3.075,-3.525 36.85,-3.525 36.85,15.225 45.825,24.2 41.05,28.975 41.05,55.9

## Keep-outs
Keep-Out Layer:
  lines w0.254: 4.699,0 1.143,0 ; 1.143,0 cw(c1.143,1.27) -0.127,1.27 -0.127,51.435 cw(c1.016,51.435) 1.016,52.578 30.099,52.578 cw(c30.099,51.435) 31.242,51.435 31.242,1.27 cw(c29.972,1.27) 29.972,0 1.143,0

## Silkscreen, mask and mechanical layers (free items; w line width, h text height)
Top Overlay:
  text "EXT" at 7.37,23.618 h0.76 r90
  text "-" at 7.37,21.967 h0.51 r90
  text "USB" at 7.497,18.538 h0.76 r90
  text "RST" at 26.793,6.227 h0.89 r270
  text "BOOT" at 4.322,3.806 h0.89 r90
Bottom Overlay:
  text "GND" at 5.62,48.93 h0.76
  text "3V3" at 27.817,48.764 h0.76
  text "3V3" at 5.62,46.39 h0.76
  text "GND" at 27.817,46.097 h0.76
  text "EN" at 5.084,43.811 h0.76
  text "IO23" at 27.944,43.43 h0.76
  text "ESP32xDatnewlevel" at 16.514,41.406 h1.65 r90
  text "I36" at 5.747,41.31 h0.76
  text "IO22" at 27.944,40.89 h0.76
  text "I39" at 5.747,38.77 h0.76
  text "TXD0" at 27.944,38.35 h0.76
  text "I34" at 5.747,36.23 h0.76
  text "RXD0" at 27.944,35.683 h0.76
  text "I35" at 5.747,33.817 h0.76
  text "IO21" at 27.817,33.397 h0.76
  text "IO32" at 5.747,31.15 h0.76
  text "GND" at 27.817,30.857 h0.76
  text "IO33" at 5.747,28.483 h0.76
  text "IO19" at 27.944,28.19 h0.76
  text "IO25" at 5.747,25.943 h0.76
  text "IO18" at 27.944,25.777 h0.76
  text "IO26" at 9.91,23.491 h0.76
  text "IO5" at 27.944,23.364 h0.76
  text "IO27" at 9.91,21.078 h0.76
  text "IO17" at 27.944,20.824 h0.76
  text "IO14" at 9.91,18.411 h0.76
  text "IO16" at 25.404,18.03 h0.76
  text "IO12" at 5.62,15.783 h0.76
  text "IO4" at 25.404,15.617 h0.76
  text "GND" at 8.64,13.331 h0.76
  text "IO0" at 28.071,13.077 h0.76
  text "IO13" at 9.148,10.918 h0.76
  text "IO2" at 27.944,10.537 h0.76
  text "VIN" at 5.211,8.124 h0.76
  text "IO15" at 28.071,7.743 h0.76